# Altium PCB Battery Bank_PCB.PcbDoc (part 3 of 3)
Units mil, origin at the board's own origin, x right, y up, seen from the top; angles counter-clockwise.
Board outline 724.09 x 1004.05 mil, 4 copper layers (Top Layer, Layer 1, Layer 2, Bottom Layer), stack 28.803 mil thick; 96 components, 54 nets, 300 pads, 157 vias.
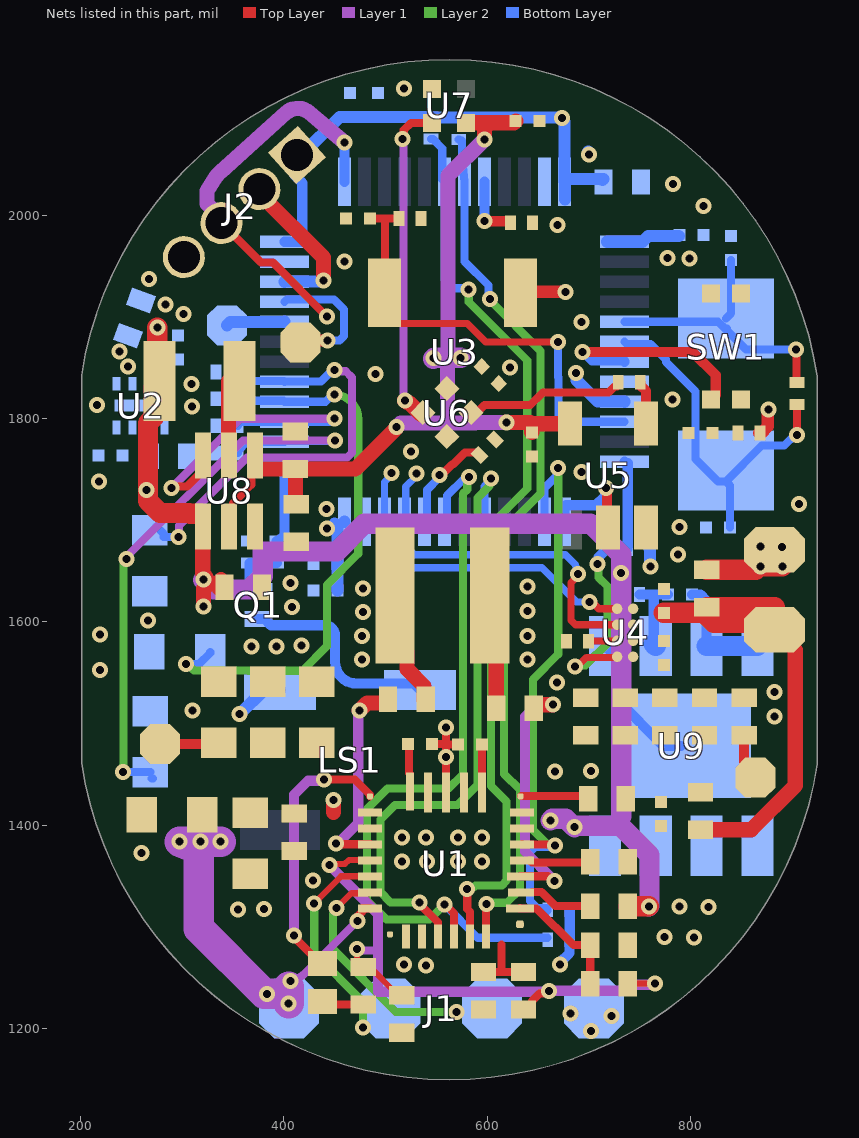
[diagram p4: the nets of this part, all layers, seen from the top]

## Part data (continued)
U2: "IC REG LINEAR 3.3V 1A 8DFN", Case/Package=DFN, LCSC Part Number=C2969937, Manufacturer=STMicroelectronics, Max Operating Temperature=85°C, Max Supply Voltage=5.5V, Min Operating Temperature=-40°C, Min Output Voltage=3.3V, Output Current=1A, Power Supply Rejection Ratio (PSRR)=55dB, Quiescent Current=155uA, ComponentLink1Description=https://www.st.com/resource/en/datasheet/ld56100.pdf?src-supplier=Digikey, ComponentLink1URL=https://www.st.com/resource/en/datasheet/ld56100.pdf?src-supplier=Digikey, Item Type=IC, Manufacturer Part Number=LD56100DPU33R, Mounting Technology="Surface Mount", Number of Regulators=1, Output Configuration=Positive, Output Type=Fixed, Packaging="Cut Tape", Pricing="1=1.23, 10=0.751, 50=0.751, 100=0.479, 1000=0.326, 10000=0.229 (USD)", RoHS=Yes, RoHS Compliant=Yes, Series=-, Supplier=Mouser
U3: "ARM Cortex-M3 STM32 F1 Microcontroller 32-Bit 72MHz 64kB FLASH LQFP48 STM32F103C8T6", Case/Package=LQFP, Clock Frequency=72MHz, Manufacturer=STMicroelectronics, Max Operating Temperature=85°C, Max Supply Voltage=3.6V, Min Operating Temperature=-40°C, Min Supply Voltage=2V, Nominal Supply Current=1.7uA, Package Quantity=1500, Supplier Part Number=511-STM32F103C8T6, Category=Microcontrollers, ComponentLink1Description=https://datasheet.ciiva.com/8054/1730126-8054942.pdf?src-supplier=Element14, ComponentLink1URL=https://datasheet.ciiva.com/8054/1730126-8054942.pdf?src-supplier=Element14, ComponentLink2Description=https://datasheet.ciiva.com/48687/001075658-da-01-en-mcu-64kb-mem-stm32f103c8t6-lqfp-48-stm-48687589.pdf?src-supplier=Conrad, ComponentLink2URL=https://datasheet.ciiva.com/48687/001075658-da-01-en-mcu-64kb-mem-stm32f103c8t6-lqfp-48-stm-48687589.pdf?src-supplier=Conrad, Core Architecture=ARM, Data Bus Width=32b, Height=1.4mm, Interface=I2C,SPI,USB,CAN,USART, Lead Free="Lead Free", Length=7mm, Manufacturer Part Number=STM32F103C8T6, Memory Format=FLASH, Memory Size=64KB, Number of A/D Converters=2NUMBER, Number of ADC Channels=10, Number of Channels=10NUMBER, Number of I/Os=37, Number of Timers/Counters=3, Packaging=Tray, Pins=48, Pricing="1=6.11, 10=5.53, 50=5.27, 100=4.58, 1000=3.47, 10000=3.33 (USD)", RAM Size=20KB, RoHS=Yes, RoHS Compliant=Yes, Series=STM32F103C8, Stock=27404, Supplier=Mouser, Weight=0.006349oz, Width=7mm
U4: "IC BATT MON LI-ION 1CELL 8WLP", LCSC Part Number=-, Manufacturer="Analog Devices Inc./Maxim Integrated", Package="8-WLP (1.66x0.92)", ComponentLink1Description=Digikey, ComponentLink1URL=https://www.digikey.com.au/en/products/detail/analog-devices-inc-maxim-integrated/MAX17048X-T10/3758922, Item Type=IC, Manufacturer Part Number=MAX17048X+T10
U5: "IC BUF NON-INVERT 5.5V SOT23-5", Case/Package=SOT-23-5, High Level Output Current=-8mA, LCSC Part Number=C100024, Low Level Output Current=8mA, Manufacturer="Texas Instruments", Max Operating Temperature=125°C, Max Supply Voltage=5.5V, Min Operating Temperature=-40°C, Min Supply Voltage=1.6V, Package Quantity=3000, Quiescent Current=1uA, Supplier Part Number 1=296-37176-6-ND, ComponentLink1Description=http://www.ti.com/lit/pdf/sdyu001?src-supplier=Digi-Key, ComponentLink1URL=http://www.ti.com/lit/pdf/sdyu001?src-supplier=Digi-Key, ComponentLink2Description=http://www.ti.com/lit/ds/symlink/sn74lv1t34.pdf?src-supplier=Avnet, ComponentLink2URL=http://www.ti.com/lit/ds/symlink/sn74lv1t34.pdf?src-supplier=Avnet, Item Type=IC, Lead Free="Lead Free", Logic Function=Buffer,Inverting, Manufacturer Part Number=SN74LV1T34DBVR, Mount="Surface Mount", Number of Bits=1, Number of Bits per Element=1, Number of Channels=1, Number of Elements=1, Number of Input Lines=1, Number of Inputs=1, Number of Output Lines=1, Number of Outputs=1, Number of Pins=5, Operating Supply Current=8mA, Packaging="Tape and Reel", Polarity=Non-Inverting, Pricing 1="1=0.43, 10=0.349, 25=0.3192, 100=0.2374, 250=0.2152, 500=0.17808, 1000=0.13356 (USD)", Propagation Delay=15.5ns, Radiation Hardening=No, REACH SVHC="No SVHC", RoHS Compliant=Yes, Stock 1=37360, Supplier 1=Digi-Key, Weight=0.000353oz
U6 U7: "Colorless transparence -40℃~+150℃ 正贴 RGB 120° 1010 Light Emitting Diodes (LED) ROHS", LCSC Part Number=C5349953, Manufacturer=XINGLIGHT, Package=1010, ComponentLink1Description=LCSC, ComponentLink1URL=https://www.lcsc.com/product-detail/span-style-background-color-ff0-RGB-span-LEDs-Built-in-IC_XINGLIGHT-XL-1010RGBC-WS2812B_C5349953.html, Item Type="RGB LED", Manufacturer Part Number=XL-1010RGBC-WS2812B
U8: "IC REG BOOST 5V 200MA SC70-6", LCSC Part Number=C116461, Manufacturer="Texas Instruments", ComponentLink1Description=https://datasheet.ciiva.com/2034/tps61220-2034085.pdf?src-supplier=Digikey, ComponentLink1URL=https://datasheet.ciiva.com/2034/tps61220-2034085.pdf?src-supplier=Digikey, ComponentLink2Description=https://datasheet.ciiva.com/14376/tps61222-14376997.pdf?src-supplier=Avnet, ComponentLink2URL=https://datasheet.ciiva.com/14376/tps61222-14376997.pdf?src-supplier=Avnet, Item Type=IC, Manufacturer Part Number=TPS61222DCKR, Pricing="1=1.08, 10=0.78, 50=0.705, 100=0.622, 1000=0.515, 10000=0.476 (USD)", RoHS=Yes, Stock=20831, Supplier=Mouser
U9: "SOIC-8-EP Battery Management ICs ROHS", LCSC Part Number=C669690, Manufacturer=XySemi, Package=SOIC-8-EP, ComponentLink1Description=LCSC, ComponentLink1URL=https://www.lcsc.com/product-detail/Battery-Management-ICs_XySemi-XB8886A_C669690.html, Item Type=IC, Manufacturer Part Number=XB8886A
X1: library part 0153G2-8.000F20DTNJL, "8MHz Surface Mount Crystal 20pF ±10ppm ±30ppm SMD5032 Crystals ROHS", LCSC Part Number=C19270155, Manufacturer=HCI, Package=SMD5032, ComponentLink1Description=LCSC, ComponentLink1URL=https://www.lcsc.com/product-detail/Crystals_HCI-0153G2-8-000F20DTNJL_C19270155.html, Item Type=Crystal, Manufacturer Part Number=0153G2-8.000F20DTNJL

## Via types
v1: diameter 15.75, hole 7.87, Top Layer to Bottom Layer, tented both sides, 156 vias
v2: diameter 15.75, hole 7.87, Top Layer to Bottom Layer, 1 vias

## Nets (pads, with @x,y where several pads share a name; then routed paths per layer and width w, separated by ;. In a path a pad name is that pad's centre, name@x,y a point inside that pad or via, vN(x,y) a via of type N, cw(c..) or ccw(c..) an arc to the next point about the centre after c; other vN are vias at no path point)
3V3: C22.2 C23.2 C25.2 C26.2 C27.2 C28.2 C29.1 C45.2 J2.1 LS1.1 R2.2 R3.2 R4.1 R5.1 R16.2 R26.2 SB1.1 SB2.1 SB3.1 SW2.1 U2.1 U2.2 U2.4 U3.1 U3.9 U3.24 U3.36 U3.48 | length 910.5
  Top Layer w12: SW2.1@632.93,1924 633.93,1925 v1(677,1925) ; R16.2@867.65,1786 R16.2@868.65,1786 869.97,1786 876.28,1792.31 876.28,1808.28 v1(877,1809)
  Bottom Layer w10: U3.36@400.68,1974.27 416.7,1974.27 418,1975.57 418,2032.16 410.45,2039.71 J2.1@410.45,2062.21 ; 647.91,2096.74 648,2096.83 ; v1(671.56,1263) 671.56,1264.56 681.08,1274.07 R4.1@681.08,1288.95 ; R4.1@681.38,1289.25 R5.1@681.38,1315.6
  Bottom Layer w12: v1(356.46,1509.55) 356.74,1509.55 380.35,1533.17 LS1.1@396.1,1533.17 ; J2.1@412.95,2059.49 417.34,2059.49 454.95,2097.09 C29.1@465,2097.09 C28.2@492.8,2097.09 ; 449.68,1696.76 452.81,1693.63 C26.2@452.81,1631 ; U3.24@459.43,1698.38 U3.24@459.73,1698.68 ; C28.2@492.98,2096.92 R2.2@544.68,2096.92 ; R2.2@544.68,2096.65 R3.2@572,2096.65 647.91,2096.65 672.04,2096.65 672.86,2095.83 v1(673.88,2095.83) 673.88,2094.81 676.19,2092.51 676.19,2073.86 U3.48@676.19,2033.4 ; U3.48@676.57,2015.98 676.57,2036 714.5,2036 C45.2@713.44,2034.94 ; v1(687.29,1844.81) 688,1844.09 688,1837.92 708.84,1817.09 735.02,1817.09 U3.9@735.32,1816.79 ; v1@699.65,2062.88 699.65,2061.02 v1(700.37,2060.3) ; U3.1@717.98,1974.57 718.28,1974.27 U3.1@735.32,1974.27 753.04,1974.27 758.66,1979.89 C27.2@788.65,1979.89 ; R26.2@759.83,1672 760.44,1671.39 760.44,1654.98 v1(761.05,1654.38)
  other v1: 266.09,1601.48 442.53,1692.19 442,1711 308.95,1834.33 246.79,1851.51 238.41,1866.13 777.72,1958.05 799.2,1957.84
5VBOOST_EN: R22.2 U3.27 U8.6 | length 341.7
  Top Layer w8: v1(289.19,1732) 290.68,1733.48 304.62,1733.48 320.41,1749.28 U8.6@320.41,1764.04
  Layer 1 w8: v1(289.19,1732) 357.19,1800 449.5,1800 v1(449.99,1800.49)
  Bottom Layer w8: R22.2@354.83,1793.1 354.83,1795.07 356.86,1797.1 U3.27@400.68,1797.1 445.01,1797.1 448.4,1800.49 v1(449.99,1800.49)
+5V_BOOST: C32.2 C35.2 C38.2 C39.2 C40.1 U5.5 U6.2 U7.2 U8.2 U8.4 | length 855.5
  Top Layer w8: U8.2@346,1693.96 349.87,1697.83 349.87,1716.84 362.87,1729.84 362.87,1730.15 367.83,1735.1 367.83,1760.27 U8.4@371.59,1764.04
  Top Layer w15: U8.4@371.59,1764.04 371.59,1750.87 371.96,1750.5 C40.1@411,1750.5 ; C39.2@412,1716 411.5,1716.5 411.5,1750 C40.1@411,1750.5 ; 497.94,1778.06 470.38,1750.5 C40.1@411,1750.5 ; 498,1778 498,1778.2 510.76,1790.97 510.76,1791.87 v1(510.91,1792.01) ; U7.2@579.25,2091.27 602.85,2091.27 ; v1(597.36,2075.05) 597.5,2075.19 597.5,2085.91 602.85,2091.27 ; v1(619.1,1796.55) 619.24,1796.41 642.59,1796.41 644,1795 C32.2@644,1786.62 ; C38.2@628.19,2093 626.46,2091.27 602.85,2091.27 ; 644,1795.09 681.51,1795.09 U5.5@681.6,1795.18
  Layer 1 w15: v1@510.76,1790.97 510.76,1791.87 v1(510.91,1792.01) 511.11,1792.01 515.06,1795.96 560.9,1795.96 ; 560.92,1859 560.92,1798.94 563.9,1795.96 588.31,1795.96 588.76,1796.41 618.96,1796.41 v1(619.1,1796.55) ; 561.56,1860 561.56,2039.26 v1(597.36,2075.05)
  Layer 1 w20: v1@547,1859 548,1860 561.56,1860 v1(574,1860)
  other v1: 547,1860
BATT-: C12.1 C42.1 TP3.2 U9.5 U9.7 U9.8 U9.9 | length 371.6
  Top Layer w20: C12.1@816,1651.5 864.4,1651.5 TP3.2@868.28,1655.38 ; v1(868.88,1654.78) 890.49,1654.78 v1(890.49,1673.66) ; TP3.2@888.55,1675.65 888.55,1676.72 TP3.2@890.49,1678.66
  Bottom Layer w10: U9.5@716,1576.33 726.79,1565.54 726.79,1542.21 727.06,1541.94 727.06,1524.44 773.5,1478 U9.9@791,1478 ; C42.1@801.81,1627 810.14,1627 816,1621.14 U9.7@816,1576.33 ; v1@868.88,1655.98 869.08,1655.79 889.77,1655.79 v1@890.76,1656.78
  Bottom Layer w20: U9.7@816,1576.33 U9.8@866,1576.33
  other v1: 890.76,1654.78 869.02,1674.26
BIT0: R19.2 SB1.2 U3.26 | length 597.9
  Layer 1 w8: v1(245.22,1662.18) 245.22,1664.17 359.8,1778.75 v1(450.19,1778.75)
  Layer 2 w8: v1(241.59,1452.17) 242.24,1452.82 242.24,1657.09 245.22,1660.08 v1(245.22,1662.18)
  Bottom Layer w8: v1@239.59,1452.17 SB1.2@268.65,1452.17 ; SB1.2@269.9,1446.1 SB1.2@271.18,1446.1 ; R19.2@354.83,1766.42 354.83,1768.39 363.85,1777.42 U3.26@400.68,1777.42 401.34,1778.08 449.53,1778.08 v1(450.19,1778.75)
BIT1: R20.2 SB2.2 U3.28 | length 555.1
  Layer 2 w8: v1(303.41,1558.52) 305.51,1558.52 311.68,1552.35 364.74,1552.35 365.08,1552.01 418.14,1552.01 442.53,1576.41 442.53,1636.56 473.12,1667.15 473.12,1800.3 ccw(c449.78,1800.3) v1(449.78,1823.64)
  Bottom Layer w8: v1(303.41,1558.52) 316.47,1558.52 327.47,1569.52 SB2.2@327.47,1570.48 ; R20.2@354.83,1820.67 354.83,1819 356.14,1817.68 399.78,1817.68 U3.28@400.68,1816.79 440.83,1816.79 447.68,1823.64 v1(449.78,1823.64)
BIT2: R21.2 SB3.2 U3.29 | length 440.1
  Layer 1 w8: v1(296.14,1683.67) 296.92,1684.45 296.92,1695 363.79,1761.87 462.38,1761.87 467.07,1766.56 467.07,1840.51 460.84,1846.74 451.26,1846.74 v1(450,1848)
  Bottom Layer w8: SB3.2@274.42,1694.11 281.37,1687.16 281.37,1683.67 v1(296.14,1683.67) ; R21.2@354.65,1847.03 R21.2@354.83,1846.86 ; R21.2@354.83,1846 R21.2@354.83,1846.86 ; R21.2@354.83,1847.97 R21.2@354.83,1846.86 ; v1(450,1848) 447.9,1848 436.69,1836.79 400.99,1836.79 U3.29@400.68,1836.47 400.13,1837.02 364.66,1837.02 R21.2@354.83,1846.86
BOOT_0: R24.1 U3.44 | length 65.8
  Top Layer w10: v1(597.53,1994.47) 622.86,1994.47 623.17,1994.16 R24.1@623.17,1993
  Bottom Layer w10: v1(597.53,1994.47) U3.44@597.53,2033.32
BOOT_1: R25.2 U3.20 | length 101.1
  Top Layer w8: v1(553.19,1744.59) 555.28,1744.59 565.62,1754.93 566.25,1754.93 578.08,1766.76 591.13,1766.76 R25.2@592.53,1765.37
  Bottom Layer w8: U3.20@538.47,1698.68 540.77,1700.98 540.77,1730.07 553.19,1742.49 v1(553.19,1744.59)
BTST1: C36.1 U1.4 | length 207.1
  Top Layer w8: v1(451.37,1381.89) 452,1381.26 484.63,1381.26 U1.4@484.7,1381.19
  Top Layer w15: v1(474.26,1512.87) 474.46,1512.87 481.95,1520.36 501,1520.36 502.5,1521.86 C36.1@502.5,1522
  Layer 1 w10: v1(451.37,1381.89) 452.92,1381.89 473.16,1402.13 473.16,1511.77 v1(474.26,1512.87)
BTST2: C37.2 U1.19 | length 260.6
  Top Layer w8: U1.19@632.83,1349.7 659.67,1349.7 664.13,1345.24 v1(666.23,1345.24)
  Top Layer w15: C37.2@646.07,1516.7 646.07,1517.19 647.5,1518.62 664.49,1518.62 v1(664.63,1518.76)
  Layer 1 w10: v1(664.63,1518.76) 663.53,1517.66 648.35,1517.66 637.33,1506.64 637.33,1374.13 v1(666.23,1345.24)
BUZZER_EN: R18.1 U3.25 | length 82.2
  Bottom Layer w10: R18.1@393,1679.83 394.97,1679.83 400.68,1685.54 U3.25@400.68,1757.73
CE: R4.2 U1.13 U3.19 | length 789.7
  Top Layer w8: v1(557.99,1321.93) 558.75,1321.93 567.37,1313.31 U1.13@567.37,1290.64
  Layer 2 w8: v1(557.99,1321.93) 543.24,1307.18 500.82,1307.18 481.94,1326.06 481.94,1416.01 501.88,1435.95 562.19,1435.95 576.35,1450.11 576.35,1726.25 580.52,1730.42 580.52,1741.01 v1(582,1742.49)
  Bottom Layer w8: v1(557.99,1321.93) 590.79,1289.13 R4.2@659.6,1289.13 ; U3.19@558.16,1698.68 560.46,1700.98 560.46,1724.33 577.13,1741.01 580.52,1741.01 v1(582,1742.49)
DIN#: R15.2 U6.4 | length 157.9
  Top Layer w8: U6.4@584.18,1806.54 590.42,1806.54 597.4,1813.51 642.52,1813.51 654.94,1825.93 719.54,1825.93 725.32,1831.72 727.86,1831.72 729.17,1833.03 R15.2@729.17,1835
DOUT1: U6.1 U7.4 | length 320.3
  Top Layer w8: v1(516.49,2075.54) 517.97,2077.03 517.97,2084.31 524.93,2091.27 U7.4@545.79,2091.27
  Top Layer w15: v1(519,1818) 519.2,1818 521.32,1815.88 523.09,1815.88 U6.1@534.86,1804.12
  Layer 1 w8: v1(516.49,2075.54) 517.74,2074.29 517.74,1819.26 v1(519,1818)
FG_ALRT: R26.1 U3.12 U4.B4 | length 294.5
  Top Layer w7: v1(686.34,1556.03) 688.71,1556.03 697.9,1565.22 727.46,1565.22 U4.B4@728,1565.76
  Layer 2 w8: v1(686.34,1556.03) 687.77,1557.46 697.01,1557.46 718.54,1578.99 718.54,1635.16 709.77,1643.93 709.77,1656.19 v1(708.67,1657.29)
  Bottom Layer w10: v1(708.67,1657.29) 709.77,1658.39 709.77,1663.92 717.86,1672 R26.1@738.17,1672 ; U3.12@735.32,1757.73 736.62,1756.43 738.49,1756.43 R26.1@738.49,1674.28
GND: C1.1 C2.1 C3.1 C4.1 C5.1 C6.1 C7.1 C8.1 C9.1 C10.2 C13.1 C14.1 C15.1 C16.1 C17.2 C18.1 C20.1 C21.1 C22.1 C23.1 C24.2 C25.1 C26.1 C27.1 C28.1 C29.2 C30.1 C31.1 C32.1 C33.2 C34.2 C35.1 C38.1 C39.1 C40.2 C41.1 C43.1 C44.1 C45.1 J1.4 J2.4 Q1.2 R7.1 R9.1 R11.1 R19.1 R20.1 R21.1 R22.1 R23.2 R24.2 R25.1 R28.1 R29.1 SW1.2 U1.10 U1.11 U1.27 U2.5 U2.9 U3.8 U3.23 U3.35 U3.47 U4.A1 U4.A4 U5.3 U6.3 U7.3 U8.3 U9.1 U9.2 U9.3 U9.4 | length 89
  Top Layer w8: C13.1@545.84,1479.78 559.48,1479.78 ; U1.27@559.5,1432.37 v1(559.48,1467.21) 559.48,1479.5 ; v1(559.48,1496) 559.48,1479.78 ; C1.1@571.19,1479.5 559.48,1479.5 ; 559.48,1479.5 559.48,1479.78
  other v1: 702.45,1197.4 722.26,1212.21 682.1,1214.53 540,1262 518,1263 803.58,1289.26 774.85,1289.92 354.81,1317.08 380.55,1317.72 817.98,1319.46 789.38,1319.85 428.69,1345.49 259.94,1372.7 667.02,1453.02 702.33,1453.15 883,1507 310,1512.87 883,1531 668.81,1540.48 219.2,1552.85 368.31,1575.72 392.82,1575.95 417.33,1576.93 219.2,1587.79 407.94,1614.85 406.47,1638.16 787.76,1666.16 789.32,1693.47 906.94,1716.28 218.21,1738.36 692.74,1747.4 525,1768 309.38,1811.95 215.8,1813.66 782.44,1819.14 490,1844 622.69,1850.28 692.93,1895.29 301.08,1903.1 283.32,1912.7 267.41,1937.76 459.73,1954.58 669.18,1990.48 812.81,2009.31 783,2031 518,2125
ILIM: R8.1 R9.2 U1.17 | length 120.8
  Top Layer w8: U1.17@632.33,1318.2 632.4,1318.14 648.74,1318.14 684.88,1282 R9.2@701.5,1282 R8.1@701.5,1245.33
INT: R5.2 U1.21 U3.14 | length 574.8
  Top Layer w8: U1.21@634.3,1381.19 634.37,1381.13 665.98,1381.13 v1(666.88,1380.23)
  Layer 2 w8: v1(666.88,1380.23) 665.98,1381.13 659.5,1381.13 645.24,1395.39 645.24,1543.51 669.97,1568.24 v1(669.97,1751.43)
  Bottom Layer w8: U3.14@656.58,1698.68 656.58,1731.75 668.49,1743.66 ; R5.2@659.6,1315.72 659.6,1317.3 658.29,1318.62 648.93,1318.62 642.28,1325.26 642.28,1373.4 647.63,1378.75 665.4,1378.75 v1(666.88,1380.23)
LED_DO_3V3: U3.13 U5.2 | length 106.8
  Top Layer w10: v1(717.12,1731.67) 718.06,1730.73 718.06,1693.76 U5.2@719,1692.82
  Bottom Layer w10: U3.13@676.27,1698.68 676.27,1713.66 677.57,1714.96 706.98,1714.96 716.02,1724 716.02,1730.57 v1(717.12,1731.67)
NetC18_2: C18.2 U1.24 | length 67.5
  Top Layer w8: U1.24@633.2,1428.81 696.69,1428.81 C18.2@699.5,1426
NetC42_2: C42.2 R27.2 U9.6 | length 79.7
  Bottom Layer w10: R27.2@750,1627 764.09,1627 ; U9.6@764.09,1578.23 764.09,1627 ; C42.2@778.19,1627 764.09,1627
  Bottom Layer w20: U9.6@764.09,1578.23 U9.6@766,1576.33
NetD+_1: D+.1 U3.33 | length 140
  Top Layer w12: D+.1@419.74,1871.4 D+.1@416.19,1874.95 429.87,1876.92 v1(443.1,1876.92)
  Bottom Layer w8: U3.33@400.68,1915.21 402.98,1917.51 428.47,1917.51 428.5,1917.55 449.44,1917.55 459.33,1907.67 459.33,1881.6 454.64,1876.92 v1(443.1,1876.92)
NetD-_1: D-.1 U3.32 | length 58.1
  Bottom Layer w12: D-.1@344,1892 347.23,1895.23 400.38,1895.23 U3.32@400.68,1895.53
NetL2_2: L2.2 U8.5 | length 73.2
  Top Layer w15: L2.2@345.37,1837 345.37,1779.43 346,1778.8 U8.5@346,1764.04
NetLED1_1: LED1.1 R6.1 | length 44.2
  Top Layer w8: LED1.1@429,1226.3 431.8,1223.5 R6.1@472,1223.5
NetLS1_2: LS1.2 Q1.3 | length 208
  Bottom Layer w10: Q1.3@375,1603 380.91,1603 387.16,1596.74 440.26,1596.74 cw(c440.26,1586.56) 450.44,1586.56 450.44,1560.43 ccw(c471.5,1560.43) 471.5,1539.37 527.7,1539.37 LS1.2@533.9,1533.17
NetQ1_1: Q1.1 R18.2 R29.2 | length 54.7
  Bottom Layer w10: Q1.1@366.14,1630.56 366.14,1633.35 366,1633.5 366,1658.17 R18.2@393,1658.17
NetR1_1: R1.1 U1.18 | length 62.5
  Top Layer w8: U1.18@644.75,1334.21 653.39,1334.21 667.27,1320.33 R1.1@701.5,1320.33
NetR15_1: R15.1 U5.4 | length 42.1
  Top Layer w10: R15.1@750.83,1835 750.83,1833.03 756.4,1827.46 U5.4@756.4,1795.18
NetR28_2: R28.2 U4.B3 | length 28.4
  Top Layer w7: R28.2@699.83,1581 700.08,1581.26 727.74,1581.26 U4.B3@728,1581.51
OSC_IN: C31.2 R17.1 U3.5 X1.1 | length 273.9
  Top Layer w8: v1(904,1868) 904.5,1867.5 904.5,1836.33 R17.1@905,1835.83
  Bottom Layer w8: U3.5@735.32,1895.53 827.28,1895.53 X1.1@835,1887.8 ; X1.1@835,1898.8 840,1903.8 C31.2@840,1956.25 ; X1.1@836.19,1888.99 X1.1@835,1887.8 ; v1(904,1868) 854.8,1868 X1.1@835,1887.8
OSC_OUT: C30.2 R17.2 U3.6 X1.2 | length 363.2
  Top Layer w8: v1(905,1784) R17.2@905,1814.17
  Bottom Layer w8: U3.6@735.32,1875.84 737.62,1873.54 760.98,1873.54 776,1858.52 776,1855.79 805,1826.79 805,1760.32 827.13,1738.2 X1.2@835,1738.2 ; C30.2@838.94,1693 838.94,1734.26 X1.2@835,1738.2 ; v1(905,1784) 902.9,1784 892.47,1773.57 870.37,1773.57 X1.2@835,1738.2
PMID: C13.2 C14.2 C15.2 C16.2 TP1.1 U1.29 | length 105.5
  Top Layer w8: C13.2@523,1480 523,1451.5 524,1450.49 524,1433.42 U1.29@524.07,1433.36
  Top Layer w10: TP1.1@278,1480 335,1480 C16.2@336,1481
PROG: R7.2 U1.20 | length 60.5
  Top Layer w8: U1.20@642.11,1365.38 644.2,1363.3 700.8,1363.3 R7.2@701.5,1364
PWR_BTN: C10.1 R23.1 SW2.2 U3.10 | length 443.7
  Top Layer w7: SW2.2@499.07,1924 499.07,1906.28 511.71,1893.64 580.5,1893.64 598.72,1875.42 v1(669.88,1875.42)
  Top Layer w8: C10.1@484.81,1997 499.67,1997 ; SW2.2@499.07,1924 499.67,1924.6 499.67,1997 ; R23.1@513.17,1997 499.67,1997
  Bottom Layer w8: v1(669.88,1875.42) 669.88,1841.05 670.23,1840.7 670.23,1801.79 674.92,1797.1 U3.10@735.32,1797.1
QON: U1.12 U3.17 | length 617.5
  Top Layer w8: v1(533.58,1324.05) 533.58,1322.48 551.56,1304.49 551.56,1290.7 U1.12@551.63,1290.64
  Layer 2 w8: v1(533.58,1324.05) 505.01,1324.05 494.94,1334.12 494.94,1405.57 509.22,1419.84 570.79,1419.84 590.37,1439.42 590.37,1721.88 602.24,1733.75 602.24,1739.95 v1(603.72,1741.43)
  Bottom Layer w8: U3.17@597.53,1698.68 597.53,1733.17 603.72,1739.36 v1(603.72,1741.43)
REGN: C17.1 R6.2 R8.2 R10.1 U1.5 | length 621.1
  Top Layer w6: v1(444.84,1360.6) 446.04,1361.8 460.12,1361.8 463.89,1365.57 484.57,1365.57 U1.5@484.7,1365.44 ; v1(472.02,1277.99) 472.02,1266.5 476.56,1261.96 482.96,1261.96 512.32,1232.59 C17.1@515.82,1232.59 C17.1@520.22,1237 ; R8.2@738.5,1244 v1(765.09,1244)
  Top Layer w8: R10.1@635.78,1218.5 639.28,1218.5 644.28,1223.5 644.28,1227 651.59,1234.31 656.21,1234.31 658.9,1237 v1@662,1237
  Layer 1 w8: v1(472.02,1277.99) 473.5,1276.51 491.74,1276.51 492.5,1275.75 ; 548,1237 549,1237 550,1236
  Layer 1 w10: v1(444.84,1360.6) 492.5,1312.93 492.5,1275.75 492.5,1236 548,1236 ; 550,1236 660,1236 v1(661,1237) ; v1@662,1237 737.22,1237 743.12,1242.9 763.99,1242.9 v1(765.09,1244)
RST: C24.1 R16.1 SW1.1 U3.7 | length 212.2
  Top Layer w10: v1(693.78,1865.57) 802.51,1865.57 825.03,1843.05 825.03,1823.63 SW1.1@820.23,1818.84
  Bottom Layer w10: v1(693.78,1865.57) 695.33,1865.57 703.44,1857.46 734.02,1857.46 U3.7@735.32,1856.16
SCL: R2.1 U1.14 U3.42 | length 890.2
  Top Layer w8: v1(579.98,1337.34) 580.41,1336.91 580.41,1317.47 583.12,1314.76 U1.14@583.12,1290.64
  Layer 2 w8: v1(579.98,1337.34) 581.47,1338.82 586.64,1338.82 588.54,1340.73 614.55,1340.73 619.24,1345.42 619.24,1423.25 603.8,1438.68 603.8,1695.73 639.56,1731.48 639.56,1857.27 581.94,1914.89 v1(581.94,1926.99)
  Bottom Layer w8: R2.1@544.68,2075.26 546.65,2075.26 555.86,2066.06 555.86,2035.62 U3.42@558.16,2033.32 558.16,1936.98 566.66,1928.48 580.45,1928.48 v1(581.94,1926.99)
SCL_BAT: U3.21 U4.B2 | length 356.9
  Top Layer w7: v1(689.34,1647.32) 689.34,1645.43 682.77,1638.85 682.77,1601.35 686.87,1597.25 U4.B2@728,1597.25
  Bottom Layer w7: v1(530.44,1746.07) 530.44,1743.71 519.93,1733.19 519.93,1699.82 U3.21@518.79,1698.68 521.59,1695.88 521.59,1673.23 528.65,1666.16 677.25,1666.16 686.72,1656.69 686.72,1656.13 687.67,1655.18 687.67,1649 v1(689.34,1647.32)
SDA: R3.1 U1.15 U3.43 | length 863.6
  Top Layer w8: U1.15@598.87,1290.64 598.93,1290.7 598.93,1321.76 v1(599.46,1322.28)
  Layer 2 w8: v1(599.46,1322.28) 600.86,1323.69 619.33,1323.69 632.24,1336.59 632.24,1434.93 616.8,1450.36 616.8,1690.34 652.72,1726.26 652.72,1866.8 602.86,1916.66 v1(602.86,1917.83)
  Bottom Layer w8: R3.1@572,2075 575.28,2073.68 575.54,2053.34 U3.43@577.84,2033.32 577.84,1954.95 601.38,1931.42 601.38,1919.32 v1(602.86,1917.83)
SDA_BAT: U3.22 U4.B1 | length 332.2
  Top Layer w7: v1(700.66,1619.83) 703.03,1619.83 709.86,1613 U4.B1@728,1613
  Bottom Layer w7: v1(505.78,1746.75) 505.78,1744.38 499.1,1737.7 U3.22@499.1,1698.68 501.9,1695.88 501.9,1666.93 515.45,1653.38 654.18,1653.38 687.73,1619.83 v1(700.66,1619.83)
STAT: LED1.2 U1.1 | length 267.8
  Top Layer w8: v1(409.77,1291.57) 409.77,1289.96 436.03,1263.7 LED1.2@438,1263.7 ; v1(439.51,1444.87) 469.74,1444.87 484.7,1429.91 U1.1@484.7,1428.44
  Layer 1 w10: v1(409.77,1291.57) 410,1291.8 410,1430 423.77,1443.77 438.41,1443.77 v1(439.51,1444.87)
SW1: C36.2 L1.1 U1.28 | length 55.9
  Top Layer w15: v1(477,1563) v1@477.2,1563 ; L1.1@521,1570 521.14,1569.86 521.14,1553.56 538,1536.7 538,1523.5 C36.2@539.5,1522
  other v1: 516.32,1364.24 540.82,1364.24 516,1388.07 539.79,1388.07 477,1586.33 478,1609.67 478,1633
SW2: C37.1 L1.2 U1.26 | length 108.6
  Top Layer w15: L1.2@602.65,1626 609,1619.65 C37.1@609,1520
  other v1: 571.21,1364.24 595.21,1364.24 571.21,1388.07 595.09,1388.07 639.59,1563 639.59,1586 639.59,1611 639.59,1635
SWDCLK: J2.3 U3.37 | length 398.3
  Top Layer w8: J2.3@338.94,1992.27 377.47,1953.74 389.16,1953.74 v1(442.45,1900.46)
  Layer 1 w15: J2.3@338.63,1992.58 338.46,1998.05 328.81,2007.12 324.26,2011.68 324.26,2024.1 333.19,2038.58 337.86,2043.25 402.03,2101.03 cw(c413.74,2088.02) 425.1,2101.34 v2(459.67,2071.84)
  Bottom Layer w10: U3.37@459.7,2033.35 v2(459.67,2071.84)
SWDIO: J2.2 U3.34 | length 153.4
  Top Layer w15: J2.2@377.19,2025.03 377.19,2020.31 438.86,1958.65 438.86,1936.14 v1(439,1936)
  Bottom Layer w12: U3.34@400.68,1934.9 400.98,1935.2 437.18,1935.2 437.99,1936 v1(439,1936)
SYS: C1.2 C2.2 C3.2 C4.2 C5.2 C6.2 TP2.1 U1.25 | length 99.3
  Top Layer w8: C1.2@594.93,1480.5 U1.25@594.93,1432.37 U1.25@595,1432.44
  Top Layer w10: C6.2@853,1488.5 853,1462.54 864,1451.54 TP2.1@864,1446.77 TP2.1@864,1442
TS: R10.2 R11.2 U1.16 | length 65.8
  Top Layer w8: R11.2@594.96,1256 R11.2@595.46,1255.5 ; R11.2@599.46,1255.5 613.59,1255.5 616.46,1255.5 ; 614.31,1282.66 614.31,1257.65 616.46,1255.5 ; R10.2@636.28,1255 R10.2@635.78,1255.5 616.46,1255.5
USB_D_N: J1.3 U1.7 | length 228.9
  Top Layer w6: v1(451.72,1318.36) 466.37,1333.01 483.76,1333.01 U1.7@484.7,1333.95
  Layer 2 w8: v1(451.72,1318.36) 451.72,1316.26 448.15,1312.69 448.15,1278 510.14,1216.01 v1(570.09,1216.01)
USB_D_P: J1.2 U1.6 | length 208.3
  Top Layer w6: v1(429.83,1323.14) 456.39,1349.7 U1.6@484.7,1349.7
  Layer 2 w8: v1(429.83,1323.14) 429.83,1274.17 478,1226 v1(478,1200.63)
VBATT: C12.2 C20.2 C21.2 C33.1 C34.1 C41.2 C43.2 C44.2 L2.1 R1.2 R27.1 TP3.1 U1.22 U1.23 U2.3 U2.6 U2.7 U2.8 U4.A2 U4.A3 U8.1 | length 1799
  Top Layer w15: U8.1@320.14,1691.85 320.14,1647.58 v1@323.44,1644.28 ; v1(320.75,1615.39) 320.89,1615.53 320.89,1632.59 326.15,1637.85 329.87,1637.85 ; v1(320.95,1641.78) 322.1,1641.78 v1@326.03,1637.85 ; C41.2@336,1633 338.1,1635.1 C41.2@338.1,1641.79 ; C43.2@810,1395.5 859.93,1395.5 903.37,1438.94 903.37,1572.53 883.64,1592.26 TP3.1@883,1592.26
  Top Layer w20: v1(275.36,1889.71) 275.36,1839.27 L2.1@277.63,1837 271.88,1831.25 271.88,1801.48 266.32,1795.91 266.32,1719 278.04,1707.29 307.08,1707.29 307.77,1706.6 U8.1@318.28,1706.6 ; R1.2@739.5,1320.18 v1(759.24,1320.18) ; C34.1@773.88,1608.81 C34.1@774,1608.93 813.44,1608.93 823,1599.37 875.89,1599.37 TP3.1@883,1592.26 ; C12.2@816,1614.5 883,1614.5 883,1594 TP3.1@899,1594
  Layer 1 w15: v1(662.17,1404.56) v1@662.37,1404.56 ; v1@685.65,1398.14 685.8,1398.14 v1@686,1398.35
  Layer 1 w20: v1@320.5,1641.34 v1(320.95,1641.78) ; 329,1634 331.04,1631.96 366.14,1631.96 379.33,1645.14 379.33,1669.32 452.01,1669.32 479.22,1696.53 701.79,1696.53 732,1666.31 v1(732,1648) 732,1408.77 ; v1@662.37,1404.56 664.26,1406.46 677.34,1406.46 v1@685.65,1398.14 ; v1(686,1398) 687.43,1399.43 731,1399.43 759.77,1370.65 759.77,1320.71 v1(759.24,1320.18)
  Bottom Layer w8: U2.3@266.87,1837.35 266.87,1858.2 275.36,1866.69 v1(275.36,1889.71) ; R27.1@728.35,1627 729.2,1627.85 729.2,1643.1 732,1645.9 v1(732,1648)
  other v1: 265,1730
VBUS: C7.2 C8.2 C9.2 J1.1 U1.2 U1.3 U1.8 U1.9 | length 399.8
  Top Layer w8: v1(472.22,1305.85) 473.71,1307.34 473.71,1311.55 477.36,1315.2 U1.8@477.36,1317.72 ; U1.8@477.42,1318.2 U1.8@484.7,1318.2
  Top Layer w15: C7.2@313.37,1403.61 C7.2@319.87,1410.11 ; 448.84,1412.69 v1(448.84,1424.81)
  Layer 1 w8: v1@410.4,1249.07 ccw(c410.4,1261.26) 419.01,1252.64 v1(472.22,1305.85)
  Layer 1 w30: v1(337.82,1383.77) v1(318.07,1383.77) v1(297.46,1383.77) 315.06,1376.48 316.39,1375.93 316.39,1298.23 380.6,1234.02 397.95,1234.02 404.69,1240.75 v1(404.69,1224.58)
  other v1: 383.21,1234.02 406.56,1246.52
pads on no net: LS1.3 U3.2 U3.3 U3.4 U3.11 U3.15 U3.16 U3.18 U3.30 U3.31 U3.38 U3.39 U3.40 U3.41 U3.45 U3.46 U5.1 U7.1

## Polygon pours and split planes (outlines as drawn)
GND on Top Layer "GND_L01_P023" (solid, pour order 23): 201.03,1461.11 200.91,1842.93 cw(c562.81,1787.35) 924.87,1841.82 925,1460 cw(c563.1,1515.58)
PMID on Top Layer "PMID_L01_P004" (solid, remove dead copper, pour order 4): 310,1499.16 532,1498.72 532,1464 530,1462 310,1462
VBATT on Top Layer "VBATT_L01_P022" (solid, pour order 22): 782.92,1574.32 782.5,1574.74 739.5,1574.74 739.5,1602.19 740.71,1603.4 764,1603.4 764,1619 782.92,1619 782.92,1612.32
+5V_BOOST on Top Layer "+5V_BOOST_L01_P021" (solid, pour order 21): 562.52,1811.24 594.04,1840.96 595.31,1842.24 596,1842.93 603.88,1850.81 585.69,1869 535.68,1869 533,1866.32 533,1841 562,1812
SW2 on Top Layer "SW2_L01_P020" (solid, pour order 20): 583,1694 648.57,1694 648.57,1559 633.57,1544 632.57,1544 584.1,1544 583,1545.13
SW1 on Top Layer "SW1_L01_P019" (solid, pour order 19): 529.57,1694 464,1694 464,1559 479,1544 480,1544 528.67,1544 529.57,1545.13
VBUS on Top Layer "VBUS_L01_P009" (solid, pour order 9): 293.81,1428.01 293.81,1381.26 368.11,1381.26 393,1402 394,1402 427,1402 433,1396 497,1396 498,1397 498,1418 431,1418 424,1425 398,1425 394.99,1428.01
VBATT on Top Layer "VBATT_L01_P008" (solid, pour order 8): 622.68,1410 622.68,1393 662,1393 668,1387 822,1387 822,1410
SW1 on Top Layer "SW1_L01_P007" (solid, pour order 7): 507.94,1354 552.94,1354 553.39,1354.29 552.94,1377.77 552.94,1400.94 547.01,1405.59 546.57,1452.69 546.38,1453 534.94,1453 534.94,1401 507.94,1401
SYS on Top Layer "SYS_L01_P005" (solid, remove dead copper, pour order 5): 588,1499 588,1463 864,1463 864,1499
SW2 on Top Layer "SW2_L01_P001" (solid, pour order 1): 606,1354 561,1354 561,1356 561,1359 561,1400.94 569.09,1407.29 570,1408 571.13,1408.88 571.33,1430.81 571.53,1452.25 572,1453 579,1453 582.94,1453 582.94,1449.06 582.94,1401 606,1401
3V3 on Layer 1 "3V3_L02_P026" (solid, pour order 26): 201.03,1461.11 200.91,1842.93 cw(c562.81,1787.35) 924.87,1841.82 925,1460 cw(c563.1,1515.58)
3V3 on Layer 1 "3V3_L02_P015" (solid, pour order 15): 211,1865 206.82,1822.18 219,1810 313,1810 313,1842 311.27,1843.73
SW1 on Layer 1 "SW1_L02_P011" (solid, pour order 11): 454,1655 454,1554 463,1545 501,1545 501,1354 505,1350 551,1350 554,1353 554,1544 552,1546 538,1546 538,1650 533,1655
+5V_BOOST on Layer 1 "+5V_BOOST_L02_P024" (solid, pour order 24): 501,1806 494,1799 494,1785 490,1777 493,1769 504,1769 516,1781 516,1802 516,1805
SW2 on Layer 1 "SW2_L02_P012" (solid, pour order 12): 661,1655 661,1554 652,1545 614,1545 614,1354 610,1350 564,1350 561,1353 561,1544 563,1546 577,1546 577,1650 582,1655
3V3 on Bottom Layer "NONET_L-01_P-001" (solid, pour order 30): 238,1894.35 235.2,1886.48 233.97,1883.23 235.2,1886.48 231.85,1877.65 231.85,1872.46 231.85,1827.43 254.73,1827.43 255.38,1828.08 255.38,1868.88 255.34,1868.88 261.5,1885.8
GND on Bottom Layer "GND_L04_P025" (solid, pour order 25): 201.03,1461.11 200.91,1842.93 cw(c562.81,1787.35) 924.87,1841.82 925,1460 cw(c563.1,1515.58)
3V3 on Bottom Layer "3V3_L04_P018" (solid, pour order 18): 279,1864 310,1864 310,1810 292,1810 290,1812 290,1827.66 289.9,1827.75 278.76,1827.75 278.76,1863.77 279.1,1864.11
VBATT on Bottom Layer "VBATT_L04_P013" (solid, pour order 13): 271,1799 271,1776 277,1776 277,1729 270,1722 231,1722 231,1799 233,1799 234,1799 247,1799
GND on Layer 2 "GND_L03_P027" (solid, pour order 27): 201.03,1461.11 200.91,1842.93 cw(c562.81,1787.35) 924.87,1841.82 925,1460 cw(c563.1,1515.58)

## Other copper
Top Layer:
  rectangle net VBATT: 312.77,1620.94 351.91,1651.61
  rectangle net RST: 819.46,1779 852,1828.44
  rectangle net VBATT: 622.67,1393 649,1416.58
Layer 1:
  rectangle net VBATT: 314.61,1611.75 335.25,1652.19
Bottom Layer:
  rectangle net BATT-: 798.06,1506 860.11,1633
  rectangle net 3V3: 670.31,2010.8 724.51,2061.81
  rectangle net 3V3: 767.69,1950.34 794.99,1986.83
  rectangle net 3V3: 767.69,1950.34 806.91,1967.21
  rectangle net BATT-: 859.1,1603 898,1681
  rectangle net 3V3: 250.37,1497.74 282.47,1645.06
  rectangle net 3V3: 433,1671 466.37,1722.52

## Silkscreen, mask and mechanical layers (free items; w line width, h text height)
Board Outline:
  the board outline again, w5

## Text inside footprints (layer, text, board x,y; h text height)
LS1: Bottom Overlay "+" at 383.9,1505.37 h39.37 r180